# Altium PCB iMX6 Rex Development Baseboard V1I1_PCB.PcbDoc (part 2 of 6)
Units mm, origin at the board's own origin, x right, y up, seen from the top; angles counter-clockwise.
Board outline 135 x 110 mm, 6 copper layers (L1, L2, L3, L4 (PWR), L5, L6), stack 1.542 mm thick; 580 components, 458 nets, 2100 pads, 1201 vias.
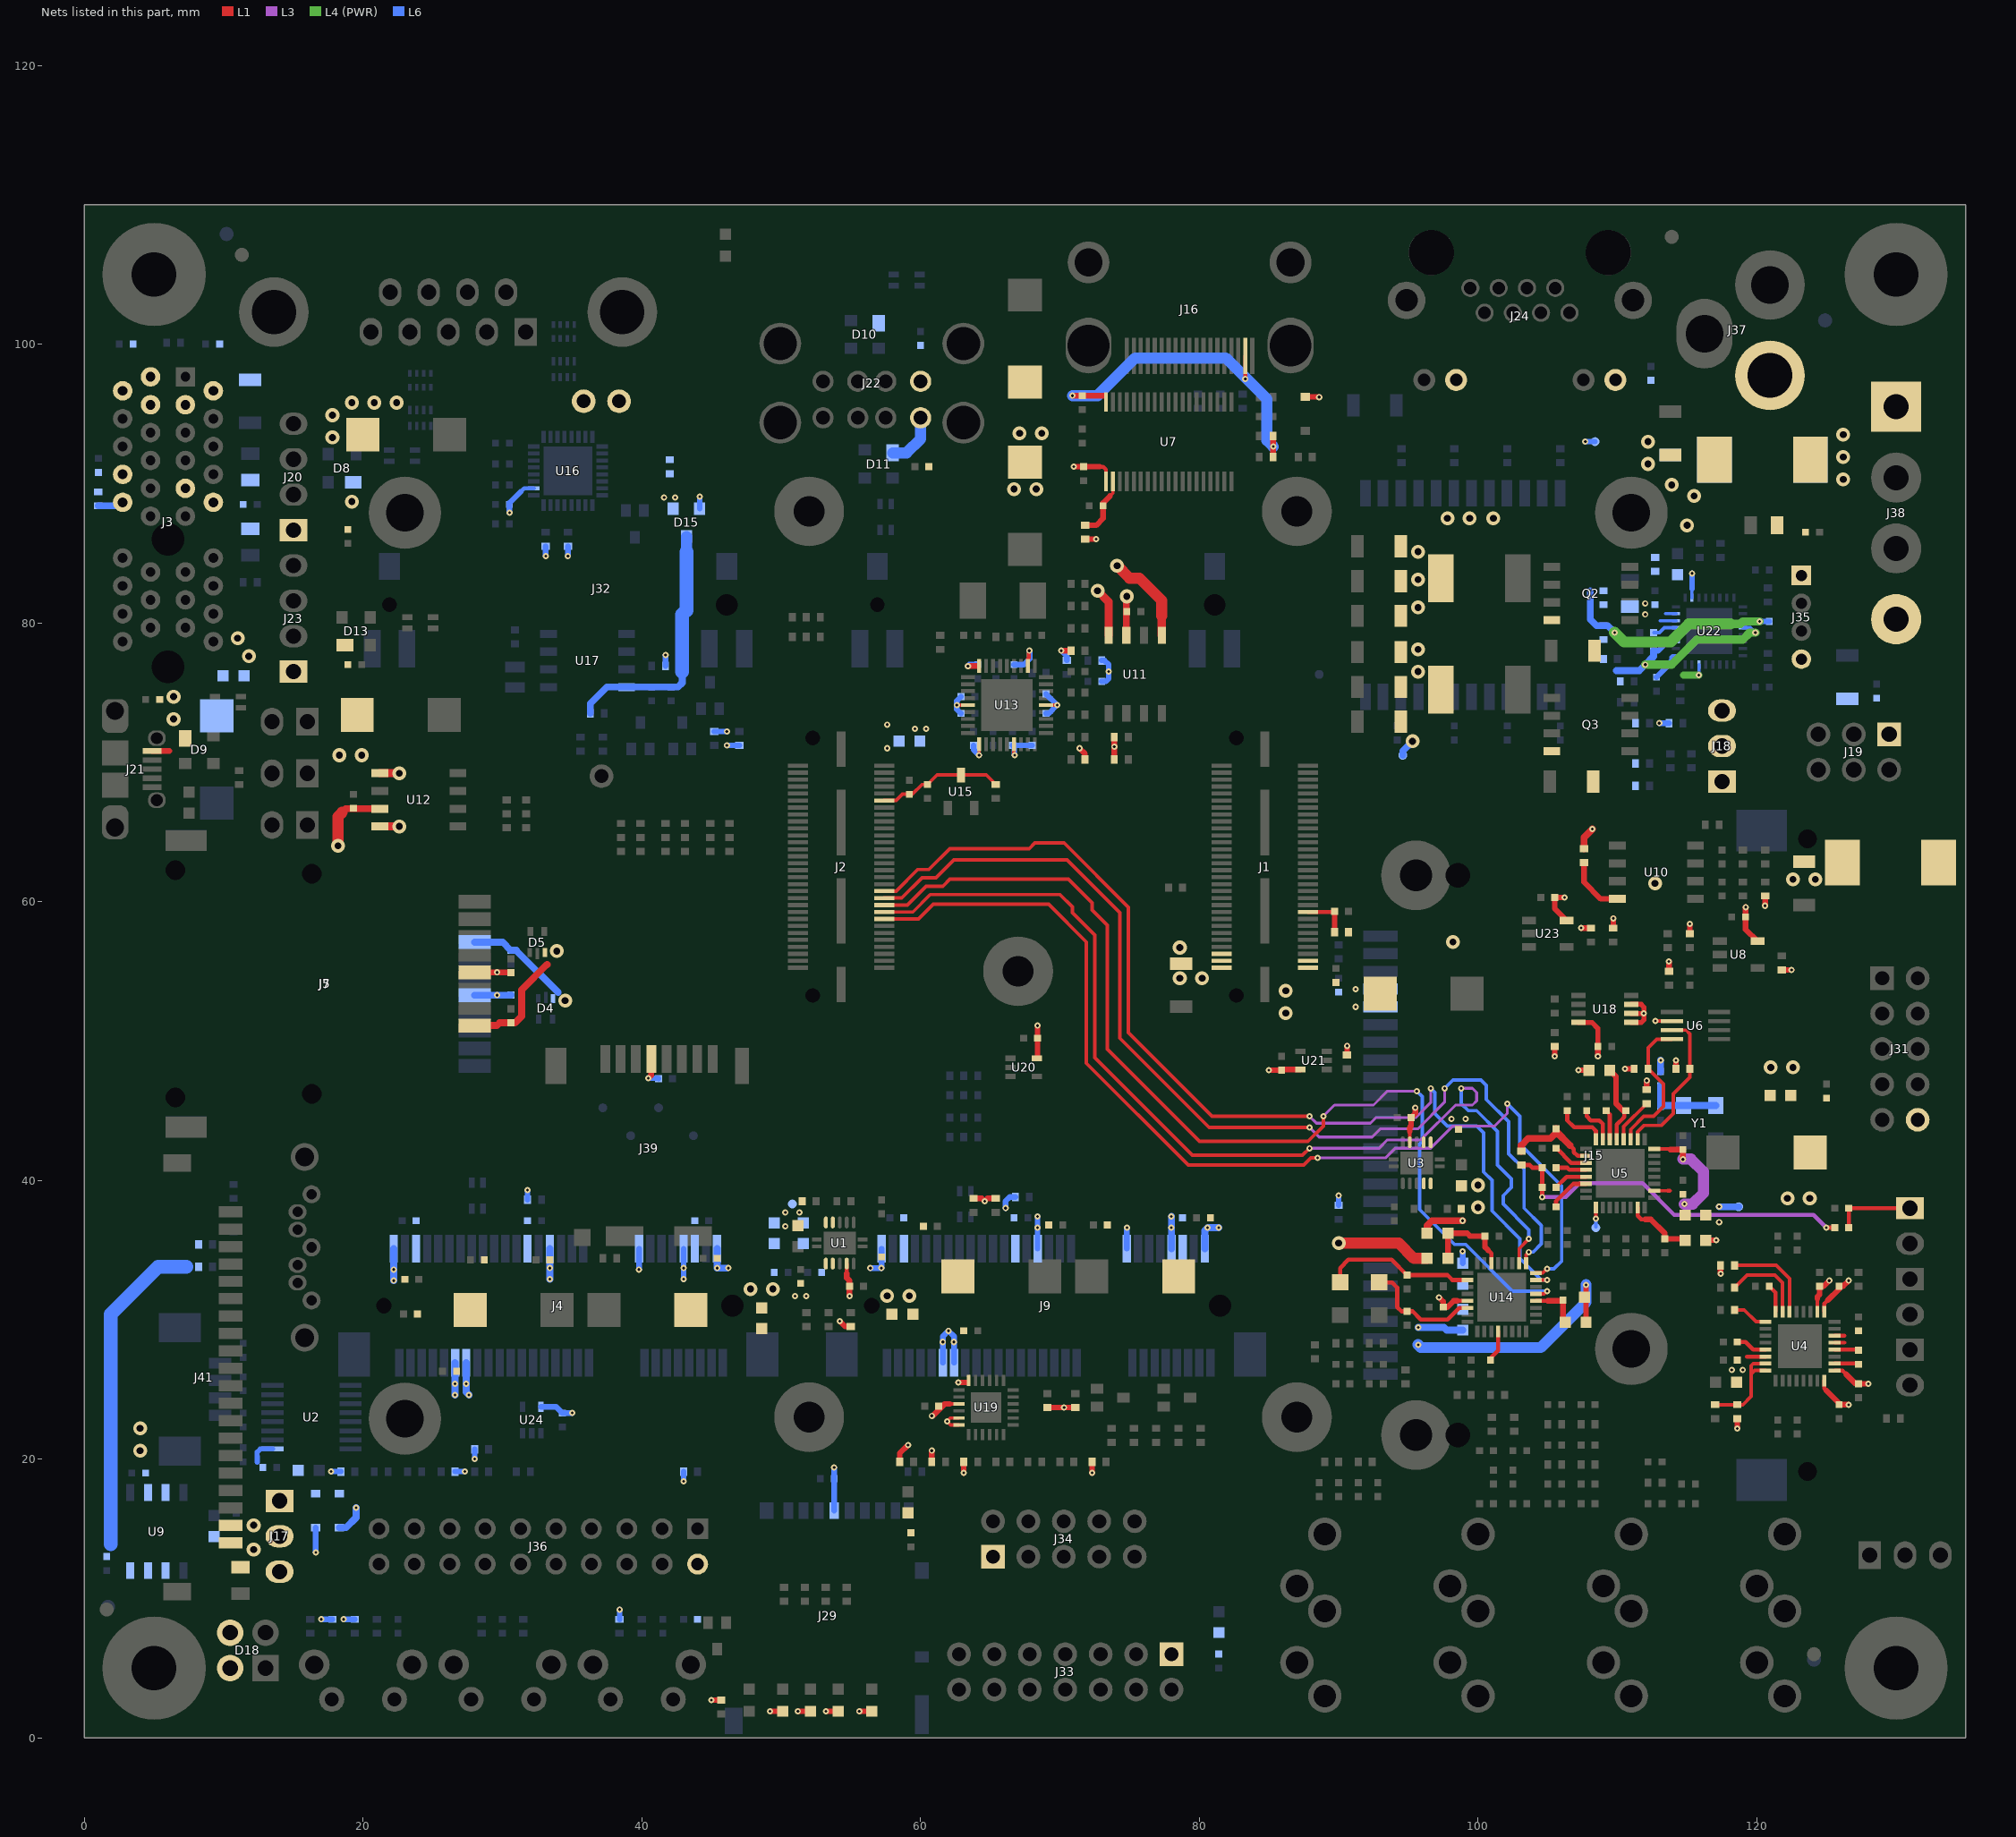
[diagram p6: the nets of this part, all layers, seen from the top]

## Footprints (in the part's own frame and the unit in brackets; to place one, negate y for a bottom-side part, rotate by r counter-clockwise, add the part's x,y. Pads: shape width x height; smd on the part's side, far side on the other; paste and mask are expansions set on the pad) (continued)
FSMRA2JH [mm] "Creator MM"
  round 1.8 hole 1: 1(-2.25,-1.245) 2(2.25,-1.245)
  round 2.2 hole 1.3: 3(-3.505,1.245) 4(3.505,1.245)
  silkscreen extent -3.65,-5.14 3.65,2.85, body extent -4.2,-5.09 4.2,2.77, height 7.05
FSMRA3JH [mm] "Creator MM"
  round 1.8 hole 1: 1(-2.25,-1.245) 2(2.25,-1.245)
  round 2.2 hole 1.3: 3(-3.505,1.245) 4(3.505,1.245)
  silkscreen extent -3.65,-7.14 3.65,2.85, body extent -4.2,-7.1 4.2,2.74, height 7.05
H5007NL [mil]
  rect 75x30 smd: 1(-287.5,275) 2(-287.5,225) 3(-287.5,175) 4(-287.5,125) 5(-287.5,75) 6(-287.5,25) 7(-287.5,-25) 8(-287.5,-75) 9(-287.5,-125) 10(-287.5,-175) 11(-287.5,-225) 12(-287.5,-275) 13(287.5,-275) 14(287.5,-225) 15(287.5,-175) 16(287.5,-125) 17(287.5,-75) 18(287.5,-25) 19(287.5,25) 20(287.5,75) 21(287.5,125) 22(287.5,175) 23(287.5,225) 24(287.5,275)
  silkscreen extent -240,-346 240,346, body extent -240,-346 240,346, height 217
HDMI [mm]
  rect 2.6x0.3 smd mask+0.025: 1(-3.36,4.5) 2(-3.36,4) 3(-3.36,3.5) 4(-3.36,3) 5(-3.36,2.5) 6(-3.36,2) 7(-3.36,1.5) 8(-3.36,1) 9(-3.36,0.5) 10(-3.36,0) 11(-3.36,-0.5) 12(-3.36,-1) 13(-3.36,-1.5) 14(-3.36,-2) 15(-3.36,-2.5) 16(-3.36,-3) 17(-3.36,-3.5) 18(-3.36,-4) 19(-3.36,-4.5)
  oval 4x3.3 hole 3: MTG1(-2.6,7.25) MTG3(-2.6,-7.25)
  round 3 hole 2: MTG2(3.36,7.25) MTG4(3.36,-7.25)
  silkscreen extent -5.1,-10 12.05,10, body extent -4.2,-7.5 7.95,7.5, height 6.28
HDR_1X2_2.54MM [mm]
  rect 2x1.6 hole 1.1: 1(0,0)
  oval 2x1.6 hole 1.1: 2(0,-2.54)
  silkscreen extent -1.3,-3.81 1.3,1.27, body extent -1.2,-3.62 1.2,1.06, height 8.4
HDR_1X2_2.54MM_SHDR [mm] "Creator MM"
  rect 2x1.6 hole 1.1: 1(0,0)
  oval 2x1.6 hole 1.1: 2(0,-2.54)
  silkscreen extent -2.3,-3.81 2.7,1.27, body extent -2.6,-3.31 2.65,0.77, height 9.34
HDR_1X3_2.54MM [mm] "Creator MM"
  rect 2x1.6 hole 1.1: 1(0,0)
  oval 2x1.6 hole 1.1: 2(0,-2.54) 3(0,-5.08)
  silkscreen extent -1.3,-6.36 1.3,1.27, body extent -1.2,-6.15 1.21,1.07, height 8.4
HDR_1X3_2.54MM_SHDR_V2 [mm] "Creator MM, Another 3D model."
  rect 2x1.6 hole 1.1: 1(0,0)
  oval 2x1.6 hole 1.1: 2(0,-2.54) 3(0,-5.08)
  silkscreen extent -2.3,-6.35 2.7,1.27, body extent -2.6,-5.85 2.65,0.77, height 9.34
HDR_1X4_2.54MM_SHDR [mm]
  rect 2x1.6 hole 1.1: 1(0,0)
  oval 2x1.6 hole 1.1: 2(0,-2.54) 3(0,-5.08) 4(0,-7.62)
  silkscreen extent -2.3,-8.9 2.7,1.3, body extent -2.6,-8.39 2.65,0.77, height 9.34
HDR_1X4_2MM_SHDR [mm] "Creator MM"
  rect 1.4x1.4 hole 0.8: 1(0,0)
  round 1.4 hole 0.8: 2(0,-2) 3(0,-4) 4(0,-6)
  silkscreen extent -2.25,-8.1 1.6,2.1, body extent -2.15,-8 1.5,2, height 5.55
HDR_2X3_2.54MM_BOXED [mm] "Creator MM"
  rect 1.7x1.7 hole 1.1: 1(0,0)
  round 1.7 hole 1.1: 2(2.54,0) 3(0,-2.54) 4(2.54,-2.54) 5(0,-5.08) 6(2.54,-5.08)
  silkscreen extent -3.03,-10.34 5.95,5.26, body extent -2.93,-10.15 5.88,5.06, height 8.89
HDR_2X5_2.54MM_BOXED [mm] "Creator MM"
  rect 1.7x1.7 hole 1: 1(0,0)
  round 1.7 hole 1: 2(2.54,0) 3(0,-2.54) 4(2.54,-2.54) 5(0,-5.08) 6(2.54,-5.08) 7(0,-7.62) 8(2.54,-7.62) 9(0,-10.16) 10(2.54,-10.16)
  silkscreen extent -2.9,-15.19 5.89,5.03, body extent -2.91,-15.22 5.91,5.08, height 8.89
HDR_2X7_2.54MM_BOXED [mm] "Creator MM"
  rect 1.7x1.7 hole 1: 1(0,0)
  round 1.7 hole 1: 2(2.54,0) 3(0,-2.54) 4(2.54,-2.54) 5(0,-5.08) 6(2.54,-5.08) 7(0,-7.62) 8(2.54,-7.62) 9(0,-10.16) 10(2.54,-10.16) 11(0,-12.7) 12(2.54,-12.7) 13(0,-15.24) 14(2.54,-15.24)
  silkscreen extent -2.9,-20.27 5.89,5.03, body extent -2.91,-20.31 5.9,5.06, height 8.89
HDR_2x10_2.54mm_BOXED [mm] "Creator MM"
  rect 1.5x1.5 hole 0.9: 1(0,0)
  round 1.5 hole 0.9: 2(0,-2.54) 3(-2.54,0) 4(-2.54,-2.54) 5(-5.08,0) 6(-5.08,-2.54) 7(-7.62,0) 8(-7.62,-2.54) 9(-10.16,0) 10(-10.16,-2.54) 11(-12.7,0) 12(-12.7,-2.54) 13(-15.24,0) 14(-15.24,-2.54) 15(-17.78,0) 16(-17.78,-2.54) 17(-20.32,0) 18(-20.32,-2.54) 19(-22.86,0) 20(-22.86,-2.54)
  silkscreen extent -28.04,-5.94 5.18,3.4, body extent -27.93,-5.85 5.09,3.3, height 9.9
HVQFN24_4X4MM [mm]
  rect 0.8x0.24 smd mask+0.025: 1(-1.95,1.25) 2(-1.95,0.75) 3(-1.95,0.25) 4(-1.95,-0.25) 5(-1.95,-0.75) 6(-1.95,-1.25) 13(1.95,-1.25) 14(1.95,-0.75) 15(1.95,-0.25) 16(1.95,0.25) 17(1.95,0.75) 18(1.95,1.25)
  rect 0.24x0.8 smd mask+0.025: 7(-1.25,-1.95) 8(-0.75,-1.95) 9(-0.25,-1.95) 10(0.25,-1.95) 11(0.75,-1.95) 12(1.25,-1.95) 19(1.25,1.95) 20(0.75,1.95) 21(0.25,1.95) 22(-0.25,1.95) 23(-0.75,1.95) 24(-1.25,1.95)
  rect 2.2x2.2 smd mask+0.025: 25(0,0)
  silkscreen extent -2,-2 2,2, body extent -2,-2 2,2, height 1
IHLP_255MILX270MIL [mil]
  rect 72x135 smd: 1(-109,0) 2(109,0)
  silkscreen extent -148,-148 148,148, body extent -135,-130 135,130, height 118
"IMX6 REX MODULE 3D" [mm] ".Creator MM"
  body extent 0,0 70,40, height 9.6
LED_0603 [mm]
  rect 0.8x0.8 smd: 1(-0.8,0) 2(0.8,0)
  silkscreen extent -1.78,-0.76 1.52,0.76, body extent -0.85,-0.4 0.85,0.4, height 0.66
MH_5.2MMD_2.7MMD [mm] "Creator MM"
  round 5.2 / inner round 3.683 / far side round 5.2 hole 2.7: 1(0,0)
MH_5MMD_2.2MMD [mm]
  round 5 / inner round 3.683 / far side round 5 hole 2.2: 1(0,0)
MH_7.4MMD_3.2MMD [mm]
  round 7.4 / inner round 3.683 / far side round 7.4 hole 3.2 mask+0.025: 1(0,0)
MINI_PCIE_36PIN [mm] "Creator MM. Bad shape of 3d model."
  rrect70% 0x0 hole 2.35: 1(0,0) 2(9.15,0)
  rect 1.4x1.4 hole 0.7: A1(-11.65,1.25)
  round 1.4 hole 0.7: A2(-10.65,3.25) A3(-9.65,1.25) A4(-8.65,3.25) A5(-7.65,1.25) A6(-6.65,3.25) A7(-5.65,1.25) A8(-4.65,3.25) A9(-3.65,1.25) A10(-2.65,3.25) A11(-1.65,1.25) A12(1.35,3.25) A13(2.35,1.25) A14(3.35,3.25) A15(4.35,1.25) A16(5.35,3.25) A17(6.35,1.25) A18(7.35,3.25) B1(-11.65,-1.25) B2(-10.65,-3.25) B3(-9.65,-1.25) B4(-8.65,-3.25) B5(-7.65,-1.25) B6(-6.65,-3.25) B7(-5.65,-1.25) B8(-4.65,-3.25) B9(-3.65,-1.25) B10(-2.65,-3.25) B11(-1.65,-1.25) B12(1.35,-3.25) B13(2.35,-1.25) B14(3.35,-3.25) B15(4.35,-1.25) B16(5.35,-3.25) B17(6.35,-1.25) B18(7.35,-3.25)
  silkscreen extent -14.75,-5.18 10.45,3.82, body extent -14.65,-5.1 10.35,3.6, height 10
MINI_PCIE_52PIN_CARD_CON [mm] "Creator MM"
  rect 2x0.6 smd mask+0.05: 1(-4.1,-0.7) 2(4.1,-1.1) 3(-4.1,-1.5) 4(4.1,-1.9) 5(-4.1,-2.3) 6(4.1,-2.7) 7(-4.1,-3.1) 8(4.1,-3.5) 9(-4.1,-3.9) 10(4.1,-4.3) 11(-4.1,-4.7) 12(4.1,-5.1) 13(-4.1,-5.5) 14(4.1,-5.9) 15(-4.1,-6.3) 16(4.1,-6.7) 17(-4.1,-10.3) 18(4.1,-10.7) 19(-4.1,-11.1) 20(4.1,-11.5) 21(-4.1,-11.9) 22(4.1,-12.3) 23(-4.1,-12.7) 24(4.1,-13.1) 25(-4.1,-13.5) 26(4.1,-13.9) 27(-4.1,-14.3) 28(4.1,-14.7) 29(-4.1,-15.1) 30(4.1,-15.5) 31(-4.1,-15.9) 32(4.1,-16.3) 33(-4.1,-16.7) 34(4.1,-17.1) 35(-4.1,-17.5) 36(4.1,-17.9) 37(-4.1,-18.3) 38(4.1,-18.7) 39(-4.1,-19.1) 40(4.1,-19.5) 41(-4.1,-19.9) 42(4.1,-20.3) 43(-4.1,-20.7) 44(4.1,-21.1) 45(-4.1,-21.5) 46(4.1,-21.9) 47(-4.1,-22.3) 48(4.1,-22.7) 49(-4.1,-23.1) 50(4.1,-23.5) 51(-4.1,-23.9) 52(4.1,-24.3)
  rect 3.2x2.3 smd: 53(-3.5,2.15) 54(-3.5,-27.15)
  rrect70% 0x0 hole 1.6: 55(0,0)
  rrect70% 0x0 hole 1.1: 56(0,-25)
  silkscreen extent -5.1,-26.8 5.1,1.8, body extent -5,-27.35 5,2.35, height 5.95
MINI_PCIE_52PIN_CARD_LATCH [mm] "Creator MM"
  rect 2.7x1.2 smd: 1(-3.15,1.25) 2(-3.15,-1.25) 4(-3.15,-22.95) 5(-3.15,-25.45)
  rect 1.9x1.5 smd: 3(2.75,0) 6(2.75,-24.2)
  rrect70% 0x0 hole 1.55: 7(0,0)
  rrect70% 0x0 hole 1.05: 8(0,-24.2)
  silkscreen extent -3.35,-26.6 3.95,2.4, body extent -3.95,-26.6 3.95,2.4, height 6.7
"MINI_PCIE_FULL CARD" [mm] ".Creator MM"
  body extent 0,0 50.95,30, height 6.9
"MSOP8 _SMALLER" [mm]
  rect 1.04x0.38 smd mask+0.076: 1(-1.9,0.975) 2(-1.9,0.325) 3(-1.9,-0.325) 4(-1.9,-0.975) 5(1.9,-0.975) 6(1.9,-0.325) 7(1.9,0.325) 8(1.9,0.975)
  silkscreen extent -1.5,-1.6 1.5,1.6, body extent -1.5,-1.6 1.5,1.6, height 0.9
POWER_JACK_5.5_2.1MM_NS [mm]
  round 5 hole 3.2: 1(2.35,-3.25)
  round 5 hole 2.7: 2(2.35,3.25)
  oval 4x5 hole 2.7: 3(-2.35,-0.25)
  silkscreen extent -2.4,-3.9 6.85,16.6, body extent -2.55,-3.9 6.85,10.5, height 11
"PW (R-PDGO-G16)" [mm] "Creator MM"
  rect 1.6x0.35 smd mask+0.07: 1(-2.8,2.275) 2(-2.8,1.625) 3(-2.8,0.975) 4(-2.8,0.325) 5(-2.8,-0.325) 6(-2.8,-0.975) 7(-2.8,-1.625) 8(-2.8,-2.275) 9(2.8,-2.275) 10(2.8,-1.625) 11(2.8,-0.975) 12(2.8,-0.325) 13(2.8,0.325) 14(2.8,0.975) 15(2.8,1.625) 16(2.8,2.275)
  silkscreen extent -1.7,-2.6 1.7,2.6, body extent -3.2,-2.5 3.22,2.5, height 0.99
"QFN32 5X5X0.85" [mm]
  rect 0.85x0.3 smd mask+0.025: 1(-2.45,1.75) 2(-2.45,1.25) 3(-2.45,0.75) 4(-2.45,0.25) 5(-2.45,-0.25) 6(-2.45,-0.75) 7(-2.45,-1.25) 8(-2.45,-1.75) 17(2.45,-1.75) 18(2.45,-1.25) 19(2.45,-0.75) 20(2.45,-0.25) 21(2.45,0.25) 22(2.45,0.75) 23(2.45,1.25) 24(2.45,1.75)
  rect 0.3x0.85 smd mask+0.025: 9(-1.75,-2.45) 10(-1.25,-2.45) 11(-0.75,-2.45) 12(-0.25,-2.45) 13(0.25,-2.45) 14(0.75,-2.45) 15(1.25,-2.45) 16(1.75,-2.45) 25(1.75,2.45) 26(1.25,2.45) 27(0.75,2.45) 28(0.25,2.45) 29(-0.25,2.45) 30(-0.75,2.45) 31(-1.25,2.45) 32(-1.75,2.45)
  rect 3.5x3.5 smd paste-10 mask+0.025: 33(0,0)
  silkscreen extent -2.5,-2.5 2.5,2.5, body extent -2.5,-2.5 2.5,2.5, height 0.9
QFN36_6MMX6MM [mm] "Creator MM"
  rect 1x0.28 smd mask+0.025: 1(-2.8,2) 2(-2.8,1.5) 3(-2.8,1) 4(-2.8,0.5) 5(-2.8,0) 6(-2.8,-0.5) 7(-2.8,-1) 8(-2.8,-1.5) 9(-2.8,-2) 19(2.8,-2) 20(2.8,-1.5) 21(2.8,-1) 22(2.8,-0.5) 23(2.8,0) 24(2.8,0.5) 25(2.8,1) 26(2.8,1.5) 27(2.8,2)
  rect 0.28x1 smd mask+0.025: 10(-2,-2.8) 11(-1.5,-2.8) 12(-1,-2.8) 13(-0.5,-2.8) 14(0,-2.8) 15(0.5,-2.8) 16(1,-2.8) 17(1.5,-2.8) 18(2,-2.8) 28(2,2.8) 29(1.5,2.8) 30(1,2.8) 31(0.5,2.8) 32(0,2.8) 33(-0.5,2.8) 34(-1,2.8) 35(-1.5,2.8) 36(-2,2.8)
  rect 3.7x3.7 smd paste-10 mask+0.025: 37(0,0)
  silkscreen extent -3.1,-3.1 3.1,3.1, body extent -3.1,-3.1 3.1,3.1, height 0.9
QTH-030-01-L-D-A [mm]
  rect 1.45x0.3 smd mask+0.025: 1(3.09,7.25) 2(-3.09,7.25) 3(3.09,6.75) 4(-3.09,6.75) 5(3.09,6.25) 6(-3.09,6.25) 7(3.09,5.75) 8(-3.09,5.75) 9(3.09,5.25) 10(-3.09,5.25) 11(3.09,4.75) 12(-3.09,4.75) 13(3.09,4.25) 14(-3.09,4.25) 15(3.09,3.75) 16(-3.09,3.75) 17(3.09,3.25) 18(-3.09,3.25) 19(3.09,2.75) 20(-3.09,2.75) 21(3.09,2.25) 22(-3.09,2.25) 23(3.09,1.75) 24(-3.09,1.75) 25(3.09,1.25) 26(-3.09,1.25) 27(3.09,0.75) 28(-3.09,0.75) 29(3.09,0.25) 30(-3.09,0.25) 31(3.09,-0.25) 32(-3.09,-0.25) 33(3.09,-0.75) 34(-3.09,-0.75) 35(3.09,-1.25) 36(-3.09,-1.25) 37(3.09,-1.75) 38(-3.09,-1.75) 39(3.09,-2.25) 40(-3.09,-2.25) 41(3.09,-2.75) 42(-3.09,-2.75) 43(3.09,-3.25) 44(-3.09,-3.25) 45(3.09,-3.75) 46(-3.09,-3.75) 47(3.09,-4.25) 48(-3.09,-4.25) 49(3.09,-4.75) 50(-3.09,-4.75) 51(3.09,-5.25) 52(-3.09,-5.25) 53(3.09,-5.75) 54(-3.09,-5.75) 55(3.09,-6.25) 56(-3.09,-6.25) 57(3.09,-6.75) 58(-3.09,-6.75) 59(3.09,-7.25) 60(-3.09,-7.25)
  rect 0.64x2.54 smd mask+0.025: 61(0,8.445) 64(0,-8.445)
  rect 0.64x4.7 smd mask+0.025: 62(0,3.175) 63(0,-3.175)
  round 0 hole 1.05 unplated: 65(2.03,-9.24) 66(2.03,9.24)
  silkscreen extent -3,-10 3.5,10, body extent -3.55,-10 3.56,10, height 4.26
R0402 [mm]
  rect 0.5x0.6 smd: 1(-0.5,0) 2(0.5,0)
  silkscreen extent -1,-0.6 1,0.6, body extent -0.5,-0.25 0.5,0.25, height 0.4
RJ45LED [mm]
  round 1.3 hole 0.9: 1(2.03,3.55) 2(0.25,2.53) 3(2.03,1.52) 4(0.25,0.5) 5(2.03,-0.51) 6(0.25,-1.52) 7(2.03,-2.54) 8(0.25,-3.56)
  round 1.575 hole 0.9: 9(-4.57,6.86) 10(-4.57,4.57) 11(-4.57,-4.57) 12(-4.57,-6.86)
  round 2.7 hole 1.6: 13(1.14,8.13) 14(1.14,-8.13)
  round 3.25 hole 3.25 unplated: 15(4.57,6.35) 16(4.57,-6.35)
  silkscreen extent -5.91,-8.3 16.6,8.3, body extent -5.9,-9.3 10.82,9.33, height 14.8
SATA_VERTICAL [mm]
  round 1.3 hole 0.74: 1(0,0) 4(-3.81,0) 7(-7.62,0)
  oval 1.1x1.3 hole 0.74: 2(-1.27,1) 3(-2.54,1) 5(-5.08,1) 6(-6.35,1)
  round 2 hole 1.35: 8(2.67,0.5) 9(-10.29,0.5)
  silkscreen extent -12.51,-2.6 4.49,3.9, body extent -12.43,-2.55 4.47,3.9, height 8.43
SC70_5 [mm]
  rect 0.75x0.4 smd mask+0.025: 1(-0.95,0.65) 2(-0.95,0) 3(-0.95,-0.65) 4(0.95,-0.65) 5(0.95,0.65)
  silkscreen extent -0.76,-1.14 0.76,1.14, body extent -1.21,-1.14 1.21,1.14, height 1.1
SC70_SOT323 [mm]
  rect 0.9x0.7 smd: 1(-0.95,0.65) 2(-0.95,-0.65) 3(0.95,0)
  silkscreen extent -0.7,-1.27 0.7,1.27, body extent -1.27,-1.27 1.27,1.27, height 1.1
SIM_CARD_PUSH [mm] "Creator MM"
  rect 2.95x1.5 smd: 1(20.7,-4.37) 2(20.7,16.18)
  rrect70% 0x0 hole 1.4: 3(21.47,-2.26) 4(11.67,13.79)
  rect 2.3x1 smd mask+0.051: C1(0,8.89) C2(0,6.35) C3(0,3.81) C5(0,7.62) C6(0,5.08) C7(0,2.54) S1(0,1.27) S2(0,0)
  silkscreen extent -0.65,-3.87 27.75,15.68, body extent -0.55,-4.6 25.95,16.35, height 1.8
SJ1-3535NG [mm]
  round 2.4 hole 1.6: 1(0,0) 2(-2,2.4) 3(-2,7.9) 4(0,11.6) 5(0,6.1)
  silkscreen extent -4.2,-5.2 4,12.8, body extent -4.2,-5.25 4,12.8, height 12.3
SMC [mm]
  rect 2.5x3.3 smd: 1(-3.45,0) 2(3.45,0)
  silkscreen extent -4.6,-3.2 4.65,3.2, body extent -3.98,-2.95 3.97,2.95, height 2.3
SOD323 [mil]
  rect 22x27 smd mask+3: 1(-48,0) 2(48,0)
  silkscreen extent -75,-28 71,28, body extent -49,-25 49,25, height 39
SOT143 [mm]
  rect 0.9x1.2 smd: 1(-1,0.8)
  rect 0.9x0.8 smd: 2(-1,-1) 3(1,-1) 4(1,1)
  silkscreen extent -1,-1.7 1,1.7, body extent -1,-1.7 1,1.7, height 1
SOT665 [mm] "Creator MM"
  rect 0.65x0.325 smd mask+0.05: 1(-0.75,0.538) 3(-0.75,-0.538)
  rect 0.8x0.25 smd mask+0.05: 2(-0.825,0)
  rect 0.65x0.4 smd mask+0.05: 4(0.75,-0.5) 5(0.75,0.5)
  silkscreen extent -1.2,-0.92 0.8,1.2, body extent -0.8,-0.8 0.8,0.8, height 0.6
SOT-23-3-123 [mm]
  rect 0.9x0.8 smd: 1(-1,0.95) 2(-1,-0.95) 3(1,0)
  silkscreen extent -0.76,-1.65 0.76,1.65, body extent -1.27,-1.65 1.27,1.65, height 1.1
TP_25C#1 [mm]
  round 0.635 smd paste-0.635 mask+0.051: 1(0,0)
TP_25C#2 [mm]
  round 0.635 smd paste-0.635 mask+0.051: 1(0,-0.05)
TSSOP_38 [mm]
  rect 1.4x0.28 smd mask+0.025: 1(-2.85,4.5) 2(-2.85,4) 3(-2.85,3.5) 4(-2.85,3) 5(-2.85,2.5) 6(-2.85,2) 7(-2.85,1.5) 8(-2.85,1) 9(-2.85,0.5) 10(-2.85,0) 11(-2.85,-0.5) 12(-2.85,-1) 13(-2.85,-1.5) 14(-2.85,-2) 15(-2.85,-2.5) 16(-2.85,-3) 17(-2.85,-3.5) 18(-2.85,-4) 19(-2.85,-4.5) 20(2.85,-4.5) 21(2.85,-4) 22(2.85,-3.5) 23(2.85,-3) 24(2.85,-2.5) 25(2.85,-2) 26(2.85,-1.5) 27(2.85,-1) 28(2.85,-0.5) 29(2.85,0) 30(2.85,0.5) 31(2.85,1) 32(2.85,1.5) 33(2.85,2) 34(2.85,2.5) 35(2.85,3) 36(2.85,3.5) 37(2.85,4) 38(2.85,4.5)
  silkscreen extent -3.1,-5 2.3,5.1, body extent -2.3,-5 2.3,5, height 1.2
USB-2A [mm]
  round 1.524 hole 1: 1(3.5,0.13) 2(1,0.13) 3(-1,0.13) 4(-3.5,0.13) 5(3.5,-2.49) 6(1,-2.49) 7(-1,-2.49) 8(-3.5,-2.49)
  round 3 hole 2.4: 9(-6.57,2.84) 10(6.57,2.84) 11(-6.57,-2.84) 12(6.57,-2.84)
  silkscreen extent -10.75,-4.5 10.75,18.4, body extent -8.1,-4.1 8.14,13.08, height 15.78
USB_MICRO_AB [mm] "Creator MM"
  rect 1.35x0.4 smd mask+0.025: 1(2.675,1.3) 2(2.675,0.65) 3(2.675,0) 4(2.675,-0.65) 5(2.675,-1.3)
  rrect84% 1.25x1.1 hole 0.85 mask+0.04: 6(3,2.225) 7(3,-2.225)
  rrect60% 1.9x2.425 hole 1.3 copper offset 0,-0.363: 8(0,4.175)
  rect 1.9x1.8 smd paste-10: 9(0,1.15) 10(0,-1.15)
  rrect60% 1.9x2.425 hole 1.3 copper offset 0,0.363: 11(0,-4.175)
  silkscreen extent -2.75,-4.3 2.85,4.3, body extent -2.75,-4.32 3.04,4.33, height 2.76
USD_DM3AT [mm] "MM added 3D model & assembly layer."
  rect 1.2x0.7 smd: 1(0,0) 2(0,-1.1) 3(0,-2.2) 4(0,-3.3) 5(0,-4.4) 6(0,-5.5) 7(0,-6.6)
  rect 1.2x0.7 smd mask+0.07: 8(0,-7.7) 9(0,-8.65)
  rect 1.2x1 smd: 10(4.3,-9.6) 14(0,1.55)
  rect 0.8x1 smd: 11(10.5,-9.6)
  rect 2.8x1 smd: 12(14.65,-9.6)
  rect 1.9x1.3 smd: 13(15.1,3.9)
  silkscreen extent -0.23,-10.03 17.49,4.44, body extent -0.1,-9.7 16.05,4.15, height 1.68
USD_DM3CS [mm] "Creator MM"
  rect 2x0.7 smd: 1(-6.4,-3.125) 2(-6.4,-2.025) 3(-6.4,-0.925) 4(-6.4,0.175) 5(-6.4,1.275) 6(-6.4,2.375) 7(-6.4,3.475) 8(-6.4,4.575)
  rect 1.4x2.7 smd: 9(6.3,-1.725) 13(6.3,3.175)
  rect 2.6x1.5 smd: 10(-5.9,-6.675)
  rect 2.6x1 smd: 11(-5.9,6.675)
  rect 1.2x1.2 smd: 12(6.4,-4.775)
  silkscreen extent -9.95,-7.22 7,6.97, body extent -7.1,-7.02 7,6.78, height 1.98
"VQFN32 5X5X0.85" [mm] "Creator MM"
  rect 0.85x0.28 smd mask+0.025: 1(-2.475,1.75) 2(-2.475,1.25) 3(-2.475,0.75) 4(-2.475,0.25) 5(-2.475,-0.25) 6(-2.475,-0.75) 7(-2.475,-1.25) 8(-2.475,-1.75) 17(2.475,-1.75) 18(2.475,-1.25) 19(2.475,-0.75) 20(2.475,-0.25) 21(2.475,0.25) 22(2.475,0.75) 23(2.475,1.25) 24(2.475,1.75)
  rect 0.28x0.85 smd mask+0.025: 9(-1.75,-2.475) 10(-1.25,-2.475) 11(-0.75,-2.475) 12(-0.25,-2.475) 13(0.25,-2.475) 14(0.75,-2.475) 15(1.25,-2.475) 16(1.75,-2.475) 25(1.75,2.475) 26(1.25,2.475) 27(0.75,2.475) 28(0.25,2.475) 29(-0.25,2.475) 30(-0.75,2.475) 31(-1.25,2.475) 32(-1.75,2.475)
  rect 3.15x3.15 smd paste-10 mask+0.025: 33(0,0)
  silkscreen extent -2.5,-2.5 2.5,2.5, body extent -2.5,-2.5 2.5,2.5, height 0.9

## Part data
C1 C3 C6 C8 C9 C10 C14 C17 C22 C23 C27 C28 C29 C30 C31 C57 C69 C71 C72 C73 C74 C75 C77 C78 C80 C83 C84 C86 C88 C89 C90 C93 C94 C97 C98 C101 C103 C106 C108 C109 C110 C111 C112 C114 C115 C116 C117 C118 C120 C121 C127 C128 C129 C140 C148 C151 C152 C153 C154 C155 C156 C157 C158 C163 C166 C167 C170 C171 C173 C175 C176 C178 C180 C186 C187 C195 C198 C199 C200 C201 C202 C203 C204 C205 C206 C207 C213 C214 C216 C218: library part C1005X5R1H104K, "CAP CER .10UF 50V X5R 10% 0402"
C2 C7 C82 C184 C185 C196 C197 C208: library part GRM31CR6YA106KA12L, "CAP CER 10UF 35V X5R 1206"
C4 C18 C33 C37 C38 C39 C41 C42 C44 C45 C46 C48 C50 C51 C53 C58 C59 C60 C61 C63 C64 C65 C66 C68 C81 C95 C105 C107 C113 C130 C131 C136 C138 C147 C159 C161 C162 C168 C169 C181 C182 C209 C211: library part C1005X5R1C105K, "CAP CER 1.0UF 16V X5R 0402"
C5 C11 C79 C177: library part C2012X5R1C226K, "CAP CER 22UF 16V 10% X5R 0805"
C12 C13 C24 C25 C70: library part T520D337M006ATE045, "CAP TANT 330UF 6.3V 20% 2917"
C15 C16 C19 C26 C32 C34 C102 C104 C141 C142 C210 C212 C215 C217: library part C1005X5R1A475M, "CAP CER 4.7UF 10V 20% X5R 0402"
C20 C35 C43 C76 C126 C150 C172 C174 C179: library part C1608X5R0J106M, "CAP CER 10UF 6.3V X5R 20% 0603"
C21 C36 C132 C133 C143 C144: library part GRM155R71H272KA01D, "CAP CER 2700PF 50V 10% X7R 0402"
C40 C85 C87 C91 C92 C96: library part T495D337K010ATE150, "CAP TANT 330UF 10V 10% 2917"
C47 C52 C55 C56 C67: library part C1005X5R1C474K, "CAP CER .47UF 16V X5R 0402"
C49: library part C1005X7R1H103K, "CAP CER 10000PF 50V 10% X7R 0402"
C54 C122 C123 C134 C135 C145 C146 C149: library part GRM155R71H271KA01D, "CAP CER 270PF 50V 10% X7R 0402"
C62: library part C1005X5R1A225K, "CAP CER 2.2UF 10V 10% X5R 0402"
C99 C100: library part C1005C0G1H180J, "CAP CER 18PF 50V C0G 5% 0402"
C119: library part C1206X102KGRACTU, "CAP CER 1000PF 2000V X7R 1206 FT"
C124 C125: library part C1005C0G1H101J, "CAP CER 100PF 50V 5% NP0 0402"
C137 C139: library part TLNS227M004R3000, "CAP TANT 220UF 4V 20% 1206"
C160: library part C1005X5R1E224M, "CAP CER .22UF 25V X5R 20% 0402"
C164 C165: library part CKCL44X7R1H221M, "CAP ARRAY 4CH 220PF 50V 0805"
C183: library part GRM21BR71H105KA12L, "CAP CER 1UF 50V X7R 0805"
C188 C189 C190 C191 C192 C193: library part C3216X5R1A107M, "CAP CER 100UF 10V X5R 20% 1206"
C194: library part C1005X7R1C103K, "CAP CER 10000PF 16V X7R 10% 0402"
CFAST1: "CF CARD EJECT/LATCHING RETAINER"
CR1 CR2: library part Card_Mini_PCIe, "Card MIni PCIe"
D1 D2 D3 D6: library part "LG L29K-G2J1-24-Z", "LED SMARTLED GREEN 570NM 0603"
D4 D5: "TVS ZENER QUAD 5.6V SOT665"
D7 D21 D22: "DIODE SCHOTTKY 30V 0.2A SOD323"
D8 D9 D10 D11 D13: "DIODE SWITCHING 50V SOT-143"
D12 D14: library part "LS L29K-H1J2-1-Z", "LED SMARTLED RED 630NM 0603 SMD"
D15: "DIODE SCHOTTKY DUAL 30V SOT23-3"
D16 D17 D20: "DIODE SCHOTTKY 60V 5A SMC"
D18: "LED 2HI 3MM GREEN OVER RED PCMNT"
D19: "SUPPRESSOR ESD 24VDC 0603 SMD"
FB1 FB2 FB3 FB4 FB22: library part BLM18SG221TN1D, "FERRITE CHIP 220 OHM 2500MA 0603"
FB5 FB8 FB9 FB14 FB15 FB16 FB17 FB18 FB24: "FERRITE CHIP 600 OHM 0402 420mA"
FB6 FB7 FB10 FB11 FB12 FB13 FB19 FB23 FB25 FB26: library part MPZ1608S601A, "FERRITE CHIP BEAD 600 OHM SMD 1A"
FB20 FB21: library part BLA2ABB221SN4D, "FERRITE ARRAY 220 OHM 0804 SMD"
FID1 FID2 FID3 FID4 FID5 FID6 FID7 FID8: "Fiducial 40mil Diameter, 120mil Mask"
J1 J2: "CONN HEADER HS .5MM 60POS DL AU"
J3: "CONN PCI EXPRESS 36POS VERT PCB"
J4 J9: "CONN MINI EXPRESS CARD 52POS SMD"
J5 J7: "CONN CARD HOLDER SIM 6POS SMD"
J6 J8: "CONN MINI EXPRESS CARD LATCH SMD"
J10 J11 J12: "CONN HEADER 2POS .100\" STR GOLD"
J13: "CONN HEADER 3POS .100\" STR GOLD"
J14: "CONN SATA HDR 7POS PCB VERT"
J15: "CFAST HEADER STANDOFF SMD R/A"
J16: "CONN RCPT 19POS HDMI RT ANG SMD"
J17 J18: library part 68000-103HLF, "BERGSTIK II .100\" SR STRAIGHT"
J19: library part 30306-6002HB, "CONN HEADER 6POS DL STR GOLD"
J20 J23: "CONN HEADER 4POS .100\" STR GOLD"
J21: library part 0475890001, "CONN RCPT MICRO USB AB R/A SMD"
J22: "CONN RCPT R/A 4OVER4POS GOLD PCB"
J24: "CONN MOD JACK 8POS R/A G-Y PCB"
J25: "CONN JACK STEREO R/A 5PIN 3.5MM"
J26 J27 J28: "CONN JACK STEREO 5POS 3.5MM PCB"
J29: "CONN MICRO SD R/A PUSH-PUSH SMD"
J30: "CONN D-SUB PLUG R/A 9POS GOLD/FL"
J31 J34: library part D2510-6002-AR, "CONN HEADER 10POS VERT 10GOLD"
J32: "HOLDER COIN CELL CR2032 EJECT"
J33: library part D2514-6002-AR, "CONN HEADER 14POS VERT 10GOLD"
J35: library part 0532530470, "CONN HEADER 4POS 2MM VERT TIN"
J36: "CONN HEADER LOPRO STR 20POS GOLD"
J37: "CONN PWR JACK 2.1X5.5MM HIGH CUR"
J38: "CONN HEADER 4POS .200 VERT"
J39: "CONN MICRO SD R/A HING TYPE SMD"
J40: "CONN HEADER 4POS 1.25MM R/A SMD"
J41: "CONN RCPT 1.25MM 20POS SMD R/A"
JP1 JP2 JP3: library part 68001-202HLF, "BERGSTIK II .100\" SR STRAIGHT"
L1 L2 L3 L4 L5 L6 L7: "CHOKE COMM MODE 90 OHM .4A SMD"
L8 L9: library part IHLP2525CZER4R7M01, "INDUCTOR POWER 4.7UH 5.5A SMD"
M1: library part 3D_iMX6_REX_MODULE_V1I1, "Printed Circuit Board"
MH1 MH2 MH3 MH4 MH13: "Mounting Hole 5mm Diameter, 2.2mm Drill"
MH5 MH6 MH7 MH8: "Mounting Hole 7.4mm Diameter, 3.2mm Drill"
MH9 MH10 MH11 MH12: "Mounting Hole 5.2mm Diameter, 2.7mm Drill"
Q1 Q4 Q5 Q6 Q7 Q8 Q9: "MOSFET N-CH 60V 310MA SOT323"
Q2 Q3: "MOSFET DL N-CH 30V 6.8A 8-SOIC"
R1 R2 R3 R4 R5 R6 R7 R8 R9 R10 R11 R12 R13 R14 R16 R24 R32 R34 R36 R37 R38 R39 R40 R41 R42 R43 R46 R56 R62 R63 R64 R65 R66 R67 R68 R69 R88 R89 R104 R105 R106 R112 R113 R120 R123 R124 R128 R129 R130 R133 R137 R138 R143 R153 R155 R156 R159 R162 R163 R164 R169 R170 R173 R174 R184: library part RC0402JR-070RL, "RES 0.0 OHM 1/16W 0402 SMD"
R15 R31 R33 R35 R51 R52 R53 R54 R55 R70 R71 R72 R73 R108 R109 R111 R114 R115 R116 R117 R118 R121 R122 R134 R135 R136 R139 R140 R147 R150 R151 R152 R154 R157 R158 R165 R166 R167 R168 R172 R183 R187: library part RC0402FR-0710KL, "RES 10.0K OHM 1/16W 1% 0402 SMD"
R17 R131 R132 R175 R176 R177 R178 R179 R180 R181 R182: library part RC0402FR-07200KL, "RES 200K OHM 1/16W 1% 0402 SMD"
R18: library part CRCW04022K10FKED, "RES 2.10K OHM 1/16W 1% 0402 SMD"
R19 R21 R22 R25 R107: library part CRCW0402330RFKED, "RES 330 OHM 1/16W 1% 0402 SMD"
R20 R27: library part CRCW04022K40FKED, "RES 2.40K OHM 1/16W 1% 0402 SMD"
R23: library part RC0402FR-071ML, "RES 1.00M OHM 1/16W 1% 0402 SMD"
R26: library part RC0402FR-073KL, "RES 3K OHM 1/16W 1% 0402 SMD"
R28 R29 R30 R102: library part RC0402FR-072K2L, "RES 2.20K OHM 1/16W 1% 0402 SMD"
R44 R74 R75 R76 R77 R79 R80 R82 R83 R96 R97 R171 R185 R186: library part RMCF0402FT100K, "RES 100K OHM 1/16W 1% 0402 SMD"
R45 R59 R78 R110: library part RC0402FR-071KL, "RES 1.00K OHM 1/16W 1% 0402 SMD"
R47 R90 R91: library part RC0402FR-0715KL, "RES 15.0K OHM 1/16W 1% 0402 SMD"
R48 R49 R57 R160 R161: library part RMCF0402FT4K99, "RES TF 4.99K OHM 1% 1/16W 0402"
R50: library part RC0402FR-0727KL, "RES 27.0K OHM 1/16W 1% 0402 SMD"
R58: library part RMCF0402FT365R, "RES TF 365 OHM 1% 1/16W 0402"
R60: library part CRCW04021K80FKED, "RES 1.80K OHM 1/16W 1% 0402 SMD"
R61: library part RC0402FR-073K3L, "RES 3.30K OHM 1/16W 1% 0402 SMD"
R81: library part RC0402FR-0712KL, "RES 12.0K OHM 1/16W 1% 0402 SMD"
R84 R85 R86 R87: library part RC0402FR-0775RL, "RES 75.0 OHM 1/16W 1% 0402 SMD"
R92 R93 R141 R142 R149: library part RMCF0402FT33R0, "RES TF 33 OHM 1% 1/16W 0402"
R94 R95 R119: library part RC0402FR-07100RL, "RES 100 OHM 1/16W 1% 0402 SMD"
R98 R99: library part CRCW0402562RFKED, "RES 562 OHM 1/16W 1% 0402 SMD"
R100 R101: library part RC0402FR-0747K5L, "RES 47.5K OHM 1/16W 1% 0402 SMD"
R125: library part RC0402FR-0710RL, "RES 10.0 OHM 1/16W 1% 0402 SMD"
R126 R127: library part RC0402FR-071RL, "RES 1.00 OHM 1/16W 1% 0402 SM"
R144 R145 R146 R148: library part RMCF0402FT240R, "RES TF 240 OHM 1% 0.0625W 0402"
SW1 SW2 SW3: "SWITCH TACTILE SPST-NO 0.05A 12V"
T1: "MODULE SINGLE GIGABIT LAN 24SOIC"
TP1 TP2 TP3 TP4 TP5 TP6 TP7 TP8 TP9 TP10: "Test Point 25mil"
U1 U3: "IC REG LDO ADJ 1.5A 10SON"
U2: "IC TOUCH SCREEN 12BIT 16TSSOP"
U4: "IC AMP AUDIO PWR 2.6W AB 32VQFN"
U5: "IC STEREO AUD CODEC LP 32TQFN-EP"
U6: "IC VOLT-LEVEL TRANSLATOR SM8"
U7: "IC HDMI TX PORT P/I 38-TSSOP"
U8 U23: "IC GATE AND SGL 2INP SOT23-5"
U9: "IC 3.0A POWER DIST SWITCH 8-SOIC"
U10: "IC OPAMP DUAL 0-70DEG C 8-SOIC"
U11 U12: "IC SW DISTRIBUTION 2CHAN 8SOIC"
U13: "USB HUB CONT IND TEMP 36QFNE3"
U14: "IC AUDIO CODEC STEREO 32-QFN"
U15: "IC VOLT SUPERVISR 2.93V SOT23-3"
U16: "IC 3DRVR/5RCVR RS232 3V 32-QFN"
U17: "IC REAL TIME CLK/CALENDAR 8-SOIC"
U18: "IC EEPROM 2KBIT 400KHZ 8MSOP"
U19: library part PCA9535BS,118, "IC I/O EXPANDER I2C 16B 24HVQFN"
U20 U21 U24: "SINGLE POSITIVE AND GATE SC-70"
U22: "IC MAIN PWR CTRLR QUAD 32-QFN"
Y1: library part ASFLMB-12.288MHZ-LR-T, "OSC MEMS 12.288 MHZ SMD"
Y2: library part ABM7-24.000MHZ-D-2-Y-T, "CRYSTAL 24.0000MHZ 18PF SMD"
Y3: library part ABS06-32.768KHZ-9-1-T, "CRYSTAL 32.768 KHZ 9.0 PF SMD"

## Via types
v1: diameter 0.45, hole 0.2, L1 to L6, tented both sides, 1092 vias
v2: diameter 1, hole 0.5, L1 to L6, tented both sides, 109 vias

## Nets (pads, with @x,y where several pads share a name; then routed paths per layer and width w, separated by ;. In a path a pad name is that pad's centre, name@x,y a point inside that pad or via, vN(x,y) a via of type N, cw(c..) or ccw(c..) an arc to the next point about the centre after c; other vN are vias at no path point)
+1V5: C20.1 FB2.2 FB10.1 FB22.2 R18.2 TP1.1 U1.9 U1.10 | length 6.8
  L1 w0.8: v2(90,35.5) 94.3,35.5 95.4,34.4 FB10.1@96.35,34.4
  other v1: 50.3,36.7 50.3,37.7 51.3,37.7
+1V5_MPCIE1: C14.1 C15.1 C203.1 C204.1 FB22.1 J4.6 J4.28 J4.48
+1V5_MPCIE2: C29.1 C30.1 C31.1 C32.1 FB2.1 J9.6 J9.28 J9.48
+1V8_AUDIO2: C35.1 FB11.2 FB19.1 FB23.2 FB24.1 FB25.2 FB26.2 R26.2 R29.2 R30.2 R116.2 TP4.1 U3.9 U3.10 U6.2 | length 11.6
  L1 w0.25: C35.1@98.625,39.775 C35.1@98.8,39.6 ; v2@99.85,39.6 v2@100.1,39.85 ; v1(112.725,51.425) U6.2@113.9,51.425
  L1 w0.4: v1(107.2,47.9) FB23.2@107.95,47.9 ; v1(110.55,48) R29.2@111.2,48 ; R116.2@112.1,46.5 v1(112.1,47.15) ; R30.2@114.2,48 v1(114.2,48.6) ; FB25.2@116.35,35.7 v1(117.1,35.7)
  L1 w0.5: FB11.2@96.35,36.2 96.35,36.75 96.7,37.1 v1(98.9,37.1)
  L6 w0.4: FB26.2@98.9,34.05 v1(98.9,34.9)
  L6 w0.5: FB24.1@113.1,47.8 v1(113.1,48.6) ; v1(117.3,38.1) TP4.1@118.7,38.1
  L6 w0.6: v2@99.95,38.05 v2(100,38.05) ; v2@100,39.6 v2(100,39.65)
  other v1: 117.3,37
+1V8_OSC: C49.1 FB24.2 Y1.1 Y1.4 | length 5.5
  L6 w0.5: C49.1@113.1,45.3 C49.1@113.1,45.4 ; FB24.2@113.1,46.8 C49.1@113.1,45.4 ; Y1.1@117.05,45.37 Y1.4@114.75,45.37 113.13,45.37 C49.1@113.1,45.4
+3V3: C5.1 C6.1 C10.1 C11.1 C18.1 C19.1 C33.1 C34.1 C69.1 C70.1 C75.1 C115.1 C126.1 C156.1 C157.1 C158.1 C163.1 C166.1 C169.2 C170.2 C171.1 C172.1 C173.1 C174.1 C175.1 C176.1 C191.1 C192.1 C193.1 C213.1 C214.1 D1.2 D2.2 D3.2 D6.2 D7.2 D15.2 D18.2 D18.4 D21.2 FB1.1 FB3.1 FB7.1 FB12.1 FB13.2 J3.A9 J3.A10 J3.B8 J15.PC13 J15.PC14 J17.3 J24.10 J24.12 J29.4 J31.10 J33.1 J34.1 J36.2 J39.4 L9.2 R11.1 R15.2 R17.2 R44.2 R46.2 R73.2 R107.1 R108.2 R109.2 R111.2 R114.2 R117.2 R118.2 R119.2 R135.2 R140.2 R147.2 R150.2 R151.2 R152.2 R157.2 R160.2 R161.2 R165.2 R167.2 R172.2 R175.2 R177.2 R178.2 R179.2 R183.2 R187.2 TP3.1 U1.1 U1.2 U1.4 U3.1 U3.2 U3.4 U8.5 U16.26 U18.1 U18.2 U18.3 U18.8 U19.18 U19.21 U19.23 U19.24 U20.5 U21.5 U22.30 U23.5 U24.5 | length 94.1
  L1 w0.24: 62.1,23.95 U19.21@62.75,23.95 ; U19.24@62.75,22.45 62.15,22.45 v1(61.9,22.7) 62.15,22.95 U19.23@62.75,22.95
  L1 w0.25: U3.4@95.1,42.725 95.1,43.5
  L1 w0.28: 54.7,33.3 U1.4@54.7,34.025
  L1 w0.3: v1(60.8,23.1) v1@60.878,23.1
  L1 w0.35: U18.8@107.2,51.325 108.175,51.325 108.6,50.9 C170.2@108.6,49.6 ; U18.1@111,51.325 111.725,51.325 111.9,51.5 v1(111.9,51.975) ; U18.2@111,51.975 v1(111.9,51.975) ; U18.3@111,52.625 111.7,52.625 111.9,52.425 v1(111.9,51.975)
  L1 w0.4: v1(40.475,47.325) 40.675,47.525 J39.4@40.675,48.7 ; v1(45,2.7) R107.1@45.7,2.7 ; v1(49.2,1.9) D1.2@50.1,1.9 ; v1(51.2,1.9) D2.2@52.1,1.9 ; v1(53.2,1.9) D3.2@54.1,1.9 ; v1(54.2,29.9) 54.6,29.5 R152.2@55,29.5 ; v1(55.6,1.9) D6.2@56.5,1.9 ; R178.2@58.5,19.8 58.5,20.4 v1(59.1,21) ; R177.2@60.8,19.8 v1(60.8,20.6) ; v1@60.878,23.1 61.728,23.95 62.1,23.95 ; v1(62.7,25.5) 63.3,25.5 ; v1(63.1,19) R179.2@63.1,19.8 ; R161.2@63.8,38.7 64.4,38.7 v1(64.6,38.5) 64.8,38.7 R160.2@65.4,38.7 ; U20.5@68.35,48.75 68.4,48.8 C171.1@68.4,50.2 v1(68.4,51.1) ; R15.2@69.1,23.7 v1(70.3,23.7) R183.2@71.1,23.7 ; R46.2@71.8,86 v1(72.6,86) ; v1(72.3,19) R175.2@72.3,19.8 ; v1@85.2,47.9 C176.1@85.9,47.9 ; C176.1@85.95,47.95 U21.5@87.25,47.95 ; D7.2@87.6,96.219 v1@88.6,96.219 ; R117.2@90.6,49 v1(90.6,49.65) ; 95.1,43.5 95.1,43.8 95.2,43.9 C34.1@95.2,44.5 95.5,44.8 v1(95.5,45.2) ; v1(105.5,48.9) R114.2@105.5,49.6 ; v1(106.2,60.3) C213.1@105.5,60.3 105.5,59.5 U23.5@106.35,58.65 ; v1(107.4,58.1) R157.2@108.1,58.1 ; FB12.1@107.75,29.8 v1(107.75,32.5) ; v1(108.6,48.9) C170.2@108.6,49.6 ; R17.2@113.7,55 v1(113.7,55.7) ; R165.2@115.2,57.7 v1(115.2,58.4) ; v1(119.2,59.6) C75.1@119.2,58.9 119.2,58 U8.5@120.05,57.15
  L1 w0.43: 54.7,33.3 54.7,33 54.9,32.8 C19.1@54.9,32.4 v1(54.9,31.7)
  L4 (PWR) w0.5: 114.75,76.25 v1(115.85,76.25)
  L6 w0.23: v1(115.85,76.25) U22.30@115.85,77
  L6 w0.3: 31.3,89.4 31.55,89.65 U16.26@32.25,89.65
  L6 w0.4: v1(16.6,13.3) D21.2@16.6,15.081 ; v1(17,8.5) R167.2@17.8,8.5 ; v1(18.6,8.5) R140.2@19.4,8.5 ; R118.2@26.6,19.1 v1(27.3,19.1) ; v1(28,20) R187.2@28,20.7 ; v1(30.5,87.9) C163.1@30.5,88.5 30.5,88.6 31.3,89.4 ; R73.2@31.8,38.6 v1(31.8,39.3) ; U24.5@32.75,23.75 33.85,23.75 C214.1@34.3,23.3 v1(35,23.3) ; v1(33.1,84.8) R109.2@33.1,85.5 ; v1(34.7,84.8) R108.2@34.7,85.5 ; R147.2@38.4,8.5 v1(38.4,9.2) ; v1(40.475,47.325) 41.175,47.325 C157.1@41.2,47.3 ; R111.2@41.7,76.9 v1(41.7,77.7) ; v1(43,18.4) R119.2@43,19.1 ; D15.2@44.15,88.2 v1(44.15,89.05) ; R172.2@45.2,72.2 v1(46.1,72.2) ; v1(46.1,71.2) R151.2@47,71.2 ; J29.4@53.8,16.3 C158.1@53.8,18.6 v1(53.8,19.4) ; v1(66.1,38) 66.1,38.5 66.4,38.8 R150.2@66.8,38.8 ; R44.2@90,38.2 v1(90,38.9) ; v1(113,72.8) R135.2@113.7,72.8
  L6 w0.5: TP3.1@94.6,70.5 94.6,70.8 v2(95.3,71.5) ; v1(95.7,29.45) 97.55,29.45 97.75,29.25 FB13.2@98.9,29.25
  L6 w0.8: v1(95.7,28.2) 95.9,28 104.5,28 107.75,31.25 v1(107.75,32.5)
  other v1: 51,31.7 51.8,31.7 98.1,44.4 99.1,44.4 85,47.9 91.215,52.445 91.215,53.715 57.6,71 57.6,72.7 88.6,96.2
  other v2: 57.6,31.7 59.2,31.7 47.8,32.2 49.4,32.2 112.7,61.3 95.7,76.5 95.7,78.1 19.2,95.8 20.8,95.8 22.4,95.8
+3V3_AUX_PCIE: J3.B10 R11.2 | length 1.9
  L6 w0.5: R11.2@1,88.4 2.5,88.4 J3.B10@2.75,88.65
+3V3_HDMI: C72.1 R46.1 U7.2 | length 4.4
  L1 w0.25: 73.6,89.1 73.8,89.3 U7.2@73.8,90.15
  L1 w0.4: R46.1@71.8,87 72.6,87 73.1,87.5 C72.1@73.1,88.4 73.1,88.6 73.6,89.1
+3V3_MODULE: C4.1 C207.1 J2.50 R128.1 U15.3 | length 9.1
  L1 w0.25: J2.50@57.39,67.25 58.25,67.25 58.7,67.7 C4.1@59.2,67.7 59.4,67.7 60.1,68.4 C207.1@60.5,68.4 61.185,69.085 64.715,69.085 R128.1@65.4,68.4
+3V3_MPCIE1: C12.1 C13.1 C16.1 C17.1 C201.1 C202.1 C215.1 C216.1 FB1.2 J4.2 J4.24 J4.39 J4.41 J4.52 | length 11.3
  L6 w0.5: v1(22.2,32.8) J4.52@22.2,35.1 ; v1(26.6,24.6) J4.41@26.6,26.9 ; J4.39@27.4,26.9 v1(27.4,25.4) 27.4,24.8 v1(27.6,24.6) ; v1(33.4,32.9) J4.24@33.4,35.1 ; J4.2@45.4,35.1 v1(45.4,33.7) v1@46.1,33.7
  other v1: 26.6,25.4 22.2,33.6 33.4,33.7 46.2,33.7
+3V3_MPCIE2: C24.1 C25.1 C26.1 C27.1 C205.1 C206.1 C217.1 C218.1 FB3.2 J9.2 J9.24 J9.39 J9.41 J9.52 | length 11.8
  L6 w0.4: v1(56.4,33.7) v1(57.2,33.7) J9.52@57.2,35.1 ; J9.41@61.6,26.9 v1(61.6,28.4) 61.6,28.8 v1(62,29.2) 62.4,28.8 v1(62.4,28.4) J9.39@62.4,26.9 ; J9.24@68.4,35.1 v1(68.4,37.4)
  L6 w0.5: J9.2@80.4,35.1 80.4,36.4 v1(80.6,36.6) v1(81.4,36.6)
  other v1: 68.4,36.6
+3V3_TS: C150.1 C151.1 D21.1 D22.1 U2.1 | length 1.9
  L6 w0.35: 12.4,20.2 12.4,20.5 12.625,20.725 U2.1@13.5,20.725
  L6 w0.4: 12.4,19.8 12.4,20.2
+3V3_USB_HUB: C101.1 C102.2 C103.1 C104.2 C109.1 C110.1 C111.1 C112.1 C113.2 FB7.2 R70.2 R71.2 R72.2 R77.2 R169.2 U13.5 U13.10 U13.15 U13.23 U13.29 U13.36 | length 18.2
  L1 w0.25: v1(64.2,70.5) U13.10@64.2,71.3 ; v1@66.7,70.5 U13.15@66.7,71.3
  L1 w0.28: v1(62.6,74.1) U13.5@63.4,74.1 ; U13.29@67.7,76.9 67.7,77.422 67.765,77.487 v1@67.765,77.965 ; U13.23@69,74.1 v1(69.8,74.1)
  L1 w0.4: v1(63.4,76.9) U13.36@64.1,76.9 ; v1(70.1,78) R77.2@70.8,78 ; v1(71.4,71) 71.8,70.6 R72.2@71.8,70.2 ; R71.2@73.9,70.4 v1(73.9,71.1) R70.2@73.9,71.8
  L6 w0.4: C109.1@62.9,73.5 62.6,73.8 v1(62.6,74.1) 62.6,74.4 C113.2@62.9,74.7 ; v1(63.4,76.9) 63.5,77 C112.1@64.1,77 ; C110.1@63.8,71.2 63.8,70.9 v1(64.2,70.5) ; C111.1@66.7,77 67.4,77 67.825,77.425 67.825,77.975 v1(67.8,78) ; v1(66.75,70.5) 66.725,70.525 66.725,71.075 C101.1@66.6,71.2 C102.2@68,71.2 ; C104.2@69,73.5 69.2,73.5 v1(69.8,74.1) C103.1@69,74.9 ; v1(70.1,78) 70.5,77.6 R169.2@70.5,77.3
  other v1: 59.6,72.4 60.4,72.4
+5V: C71.1 C89.1 C90.1 C95.1 C177.1 C178.1 C188.1 C189.1 C190.1 C208.1 D20.2 FB4.1 FB6.1 J17.1 J18.3 J35.1 J35.4 L8.1 R51.2 R57.2 R75.1 R158.2 R159.2 TP2.1 U7.1 U11.7 U12.7 U22.10 | length 18.3
  L1 w0.28: 72.85,91.2 73.1,91.2 73.3,91 U7.1@73.3,90.15
  L1 w0.4: v1(71,91.2) C71.1@71.7,91.2 72.85,91.2 ; R158.2@109.7,58.1 v1(109.7,58.8) ; v1(120.6,59.7) R57.2@120.6,60.4 ; R51.2@121.8,55.1 v1(122.5,55.1)
  L1 w0.5: 18.5,66.4 18.765,66.665 U12.7@21.2,66.665 ; U11.7@74.765,79.1 v2@74.765,81.9 ; J35.1@123.1,83.5 J35.1@123.2,83.4
  L1 w0.8: v2(18.2,64) 18.2,66.1 18.5,66.4
  L6 w0.23: U22.10@115.35,81.8 115.35,82.45
  L6 w0.4: C95.1@73,75.8 73.3,75.8 73.5,76 v1(73.5,76.5) 73.5,77 73.2,77.3 R75.1@73,77.3 ; v1(107.7,93) TP2.1@108.4,93 ; 115.35,82.45 v1(115.35,83.55)
  other v2: 121,48.1 122.6,48.1 98.2,57.1 122.6,61.6 124.2,61.6 11.8,77.6 11,78.9 95.7,81.1 74.8,81.9 95.7,83.1 95.7,85.1
+5V_ATX: D20.1 J38.4 | length 0.6
  L1 w1: J38.4@130,80.26 J38.4@130.43,79.83
+5V_AUDIO1: C37.1 C38.1 C39.1 C40.1 C41.1 C42.1 C43.1 FB4.2 R31.2 R33.2 U4.8 U4.9 U4.17 U4.18 U4.30 | length 14.2
  L1 w0.28: 119.3,27.35 U4.30@120.625,27.35 ; U4.18@124.35,30.575 124.35,31.5 ; U4.8@124.85,25.625 124.85,25.05 125,24.9 ; U4.17@124.85,30.575 124.85,31.15 125.1,31.4 ; U4.9@125.575,26.35 126.15,26.35 126.4,26.1
  L1 w0.4: v1(117.4,33.3) R31.2@117.4,33.9 ; v1(118.6,22.2) R33.2@118.6,22.9 ; 124.35,31.5 124.35,31.65 124.5,31.8 C39.1@124.5,32.4 124.8,32.4 v1(125.2,32.8) ; 125,24.9 125.9,24 C38.1@125.9,23.9 v1(126.6,23.9) ; 125.1,31.4 125.9,32.2 C41.1@125.9,32.4 126.2,32.4 v1(126.6,32.8) ; 126.4,26.1 127.1,25.4 C42.1@127.3,25.4 v1(128,25.4)
  other v1: 118.2,26.4 119,26.4
  other v2: 122.2,38.7 123.8,38.7
+5V_HDMI_CON: C74.1 J16.18 R48.2 R49.2 U7.38 | length 25.4
  L1 w0.28: U7.38@73.2,96.3 U7.38@73.3,96.3
  L1 w0.3: v1(83.3,97.5) J16.18@83.3,99.14
  L1 w0.4: v1(70.9,96.3) C74.1@71.6,96.3 U7.38@73.2,96.3 ; R49.2@85.3,91.9 v1(85.3,92.65) R48.2@85.3,93.4
  L6 w0.8: v1(70.9,96.3) 72.7,96.3 75.4,99 81.896,99 84.85,96.046 84.85,93.1 v1(85.3,92.65)
+5V_LDO1: C179.1 C180.1 R123.2 U22.7 | length 0.8
  L6 w0.23: 113.45,80.65 U22.7@114.2,80.65
+5V_PVCC1: C181.1 R123.1 R124.2 R125.1 U22.19 | length 17.8
  L4 (PWR) w0.6: 118.1,79.925 118.825,79.925 119,80.1 v1(120.2,80.1)
  L4 (PWR) w0.8: v1(109.8,79.3) 109.804,79.3 110.479,78.625 113.825,78.625 115.125,79.925 118.1,79.925
  L6 w0.23: U22.19@119,80.15 120.15,80.15 v1(120.2,80.1)
  L6 w0.4: 119.8,80.1 C181.1@120.9,80.1
  L6 w0.5: 108.05,82.3 108.05,80.25 108.5,79.8 R125.1@109,79.8 109.311,79.8 109.311,79.789 v1(109.8,79.3)
+5V_USB1_VBUS: C85.1 C86.1 D8.1 J20.1 U12.5 | length 1.4
  L1 w0.58: U12.5@21.2,69.205 v2(22.6,69.205)
  other v2: 19.2,88.7 17.8,93.3 17.8,94.9
+5V_USB_OTG: C87.1 C88.1 D9.1 FB6.2 J21.1 | length 1.2
  L1 w0.4: J21.1@4.875,70.8 6.1,70.8
  other v2: 6.4,73.1 6.4,74.7
+5V_USB_VBUS: C3.1 J1.18 R159.1 | length 3.4
  L1 w0.3: J1.18@87.79,59.25 C3.1@89.7,59.25
  L1 w0.4: R159.1@89.7,57.8 C3.1@89.7,59.25
+5V_USBDN1_VBUS: C91.1 C93.1 D10.1 J22.1 U11.8 | length 3.5
  L1 w0.58: v2(72.7,82.3) 73.495,81.505 U11.8@73.495,79.1
  other v2: 67.1,93.6 68.7,93.6
+5V_USBDN2_VBUS: C92.1 C94.1 D11.1 J22.5 U11.5 | length 10.7
  L1 w0.6: U11.5@77.305,79.1 77.305,80.5
  L1 w0.8: v2(74.1,84.1) 75,83.2 75.7,83.2 77.3,81.6 77.3,80.505 77.305,80.5
  L6 w0.8: D11.1@58,92.2 59,92.2 60,93.2 J22.5@60,94.71
  other v2: 66.7,89.6 68.3,89.6
+5V_USBDN3_VBUS: C96.1 C97.1 D13.1 J23.1 U12.8 | length 1.4
  L1 w0.58: U12.8@21.2,65.395 v2(22.6,65.395)
  other v2: 18.3,70.5 19.9,70.5
+5V_VCC1: C182.1 R125.2 R129.2 R133.2 R134.2 R136.2 R154.2 U22.3 U22.20 | length 15.3
  L4 (PWR) w0.6: v1(112,77) 113.9,77 115.7,78.8 119,78.8 119.5,79.3 v1(119.9,79.3)
  L6 w0.23: 113.347,78.425 113.572,78.65 U22.3@114.2,78.65 ; U22.20@119,79.65 119.55,79.65 v1(119.9,79.3)
  L6 w0.4: C182.1@112.6,78 112.922,78 113.347,78.425
  L6 w0.5: 109.925,76.575 111.575,76.575 v1(112,77) 112.6,77.6 C182.1@112.6,78
+12V_ATX: C7.1 C8.1 C9.1 D17.2 J3.A2 J3.A3 J3.B1 J3.B2 J3.B3 J18.1 J38.1 | length 0.1
  L6 w0.5: J3.B2@2.7,96.7 J3.B2@2.75,96.65 ; J3.A2@9.2,96.7 J3.A2@9.25,96.65
  other v2: 126.2,90.3 126.2,91.9 126.2,93.5
+AUD2_AVDD: C45.1 FB23.1 U5.5 | length 5.8
  L1 w0.3: U5.5@109.95,42.95 109.95,44 110.45,44.5 110.5,44.55 C45.1@110.5,44.9
  L1 w0.4: FB23.1@109.45,47.9 109.9,47.45 109.9,45.5 C45.1@110.5,44.9 ; C45.1@110.4,45 C45.1@110.6,45
+AUD2_DVDD: C44.1 C50.1 FB19.2 U5.26 U5.32 | length 9.1
  L1 w0.25: U5.32@112.55,42.25 U5.32@112.65,42.25 113.85,42.25 ; U5.26@112.65,39.25 113.6,39.25
  L1 w0.3: 113.6,39.25 113.75,39.25
  L1 w0.4: 113.8,42.2 C44.1@114.7,42.2 v1(114.7,41.5)
  L3 w0.8: v1@114.7,41.525 115.275,41.525 116.175,40.625 116.175,39.075 115.4,38.3 v1(114.8,38.3)
+AUD2_PVDD: C51.1 FB25.1 U5.23 | length 5
  L1 w0.3: U5.23@111.45,38.05 111.45,37.45 111.7,37.2 112,37.2
  L1 w0.4: 112,37.2 112.4,37.2 113.4,36.2 C51.1@113.4,35.8 114.75,35.8 FB25.1@114.85,35.7
+BAT: J32.2 J32.3 R110.1
+BKLT_VCC: C82.1 C83.1 J18.2 J19.1
+MPCIE1_SIM_PWR: C22.1 D4.3 J4.8 J5.C1 | length 9.7
  L6 w0.4: v1(43,32.9) J4.8@43,35.1
  L6 w0.5: J5.C1@28,57.09 30.01,57.09 C22.1@30.6,56.5 30.984,56.5 34,53.484
  other v1: 43,33.7
  other v2: 34.5,52.9
+MPCIE1_SIM_VPP: C23.1 J4.16 J5.C6 | length 4.1
  L6 w0.4: v1(39.8,33.6) J4.16@39.8,35.1
  L6 w0.5: J5.C6@28,53.28 v1(29.6,53.28) 30.58,53.28 C23.1@30.6,53.3
+MPCIE2_SIM_PWR: C28.1 D5.3 J7.C1 J9.8 | length 10.1
  L1 w0.5: J7.C1@28,51.11 29.6,51.11 29.79,51.3 C28.1@30.6,51.3 ; 30.9,51.3 31.375,51.775 31.375,53.659 33.2,55.484
  L6 w0.5: J9.8@78,35.1 v1(78,36.6) v1(78,37.4)
  other v2: 33.9,56.45
+MPCIE2_SIM_VPP: C106.1 J7.C6 J9.16 | length 4.1
  L1 w0.4: J7.C6@28,54.92 v1(29.6,54.92) 30.58,54.92 C106.1@30.6,54.9
  L6 w0.4: J9.16@74.8,35.1 v1(74.8,36.6)
+RTC: C167.1 C168.1 D15.3 R171.2 U17.8 | length 18.5
  L6 w0.5: R171.2@36.3,73.5 36.3,74.2 37.495,75.395 U17.8@38.9,75.395 38.905,75.4 C167.1@40.7,75.4 C168.1@42.1,75.4 42.6,75.4 42.9,75.7 42.9,76.5
  L6 w0.8: 43.2,85.1 D15.3@43.2,86.2
  L6 w1: 42.9,76.5 42.9,80.6 43.2,80.9 43.2,85.1
+V_INPUT: D16.2 J37.1
+VBAT: D15.1 D22.2 R110.2 R185.2 | length 2.9
  L6 w0.4: v1(17.7,19.1) R185.2@18.4,19.1
  L6 w0.5: D22.2@18.3,15.081 18.781,15.081 19.5,15.8 v1(19.5,16.5)
  other v1: 41.6,89 42.4,89
+VDD_LVDS: C76.1 C77.1 C78.1 C79.1 J41.1 J41.2 R52.2 R53.2 U9.6 U9.7 U9.8 | length 23.3
  L6 w1: 1.9,13.9 1.9,30.4 5.3,33.8 7.3,33.8
  other v2: 12.15,13.5 12.15,15.25
+VDD_LVDS_SW: C80.1 J17.2 U9.2 U9.3
  other v2: 4,20.6 4,22.2
+VDDA: C129.1 FB13.1 FB26.1 U14.5 | length 2.4
  L1 w0.3: 98.5,31.35 U14.5@98.85,31.35
  L1 w0.4: v1(97.2,31.6) 97.5,31.3 C129.1@97.5,30.9 97.8,30.9 98.25,31.35 98.5,31.35
+VDDD: C128.1 FB10.2 FB11.1 U14.30 | length 6.6
  L1 w0.3: 100.725,34.975 100.95,34.75 U14.30@100.95,34.05
  L1 w0.4: FB10.2@97.85,34.5 FB11.1@97.85,36.2 99.225,36.2 99.425,36 C128.1@100.5,36 100.5,35.2 100.725,34.975
+VDDIO: C127.1 FB12.2 U14.20 | length 3.6
  L1 w0.3: U14.20@104.15,31.35 105,31.35
  L1 w0.4: 105,31.35 106.05,31.35 C127.1@106.1,31.4 106.1,29.95 FB12.2@106.25,29.8
+VIN: C1.1 C2.1 C183.1 C184.1 C185.1 C196.1 C197.1 D16.1 D17.1 J1.1 J1.2 J1.3 J1.4 J1.5 Q2.8 Q3.8 R56.2 R124.1 U22.6 | length 2.8
  L1 w0.5: R56.2@107.6,63.8 107.6,64.6 v1(108.2,65.2)
  L6 w0.23: 113.05,80.15 U22.6@114.2,80.15
  other v1: 112,80.6 112,81.4
  other v2: 86.2,52 86.2,53.6 78.6,54.5 80.2,54.5 78.6,56.7 115,87 97.8,87.5 99.4,87.5 101.1,87.5 115.5,89.1 113.9,89.9 112.2,91.4 112.2,93
+VIN_LVDS_AMP: R56.1 U10.8 | length 4.3
  L1 w0.4: R56.1@107.6,62.8 107.6,61.4 108.805,60.195 U10.8@110,60.195
+VREF1_2V_3V3: C195.1 U22.1 | length 2.2
  L6 w0.23: 113.8,77.3 113.85,77.35 113.85,77.55 113.95,77.65 U22.1@114.2,77.65
  L6 w0.4: C195.1@112.8,76.1 113.8,77.1 113.8,77.2
+VREF1_3V3_3V3: C194.1 U22.5 | length 1.7
  L6 w0.23: C194.1@112.6,79.3 113.013,79.3 113.363,79.65 U22.5@114.2,79.65
AMP_BYPASS: C67.2 U4.24 | length 2
  L1 w0.28: C67.2@120.9,32.4 121.35,31.95 U4.24@121.35,30.575
AMP_C1N: C66.1 U4.12 | length 1.7
  L1 w0.28: U4.12@125.575,27.85 127.25,27.85 C66.1@127.3,27.8
AMP_C1P: C66.2 U4.10 | length 1.7
  L1 w0.28: U4.10@125.575,26.85 127.25,26.85 C66.2@127.3,26.8
AMP_GAIN: R33.1 R35.2 U4.31 U4.32 | length 7.3
  L1 w0.25: R35.2@117,23.9 R33.1@118.6,23.9 119,23.9 119.6,24.5 119.6,26.1 ; U4.32@120.625,26.35 119.85,26.35 119.6,26.1 ; U4.31@120.625,26.85 119.75,26.85 119.6,26.7 119.6,26.1
AMP_HP_EN: R31.1 U4.22 | length 6.7
  L1 w0.25: R31.1@118.4,33.9 121.4,33.9 122.35,32.95 U4.22@122.35,30.575
AMP_PVSS: C58.1 U4.13 U4.14 | length 1.5
  L1 w0.28: U4.13@125.575,28.35 126.3,28.35 ; U4.14@125.575,28.85 126.3,28.85
AMP_REG_EN: R32.2 U4.25 | length 2.6
  L1 w0.25: R32.2@118.4,30.7 119.1,30.7 119.95,29.85 U4.25@120.625,29.85
AMP_REG_OUT: C68.2 U4.29 | length 2.3
  L1 w0.28: C68.2@118.6,28.4 119.193,28.4 119.743,27.85 U4.29@120.625,27.85
AMP_SPKR_ENN: R34.2 U4.23 | length 6.1
  L1 w0.25: R34.2@118.4,32.3 119.3,33.2 121.3,33.2 121.85,32.65 U4.23@121.85,30.575
AUD2_AUX: TP5.1 U5.17 | length 1.5
  L1 w0.25: v1(108.45,37.25) U5.17@108.45,38.05
  L6 w0.25: TP5.1@108.45,36.65 v1@108.45,37.3
AUD2_FIL_MIC_IN: C54.1 FB5.2 J11.1 | length 5.8
  L1 w0.3: FB5.2@126.6,36.6 C54.1@126.6,38 J11.1@131,38
AUD2_I2C2_SCL: R30.1 U5.2 U6.3 | length 11.2
  L1 w0.25: U5.2@111.45,42.95 111.45,43.484 111.9,43.934 113.134,43.934 114,44.8 114,46.2 115.2,47.4 R30.1@115.2,48 115.2,50.5 114.925,50.775 U6.3@113.9,50.775
AUD2_I2C2_SDA: R29.1 U5.3 U6.4 | length 10.3
  L1 w0.25: U5.3@110.95,42.95 110.95,43.65 111.9,44.6 112.6,44.6 113.3,45.3 113.3,46.9 R29.1@112.2,48 112.2,49.5 112.825,50.125 U6.4@113.9,50.125
AUD2_IRQ: R116.1 U5.4 | length 3.2
  L1 w0.25: U5.4@110.45,42.95 110.45,43.85 R116.1@112.1,45.5
AUD2_MIC_BIAS: C46.1 R28.2 U5.10 | length 6.5
  L1 w0.3: 106.6,42.5 106.875,42.225 106.875,42.025 107.15,41.75 U5.10@107.75,41.75
  L1 w0.5: R28.2@103.1,42.1 103.1,42.5 103.6,43 105.2,43 105.6,43.4 ; C46.1@105.6,43.7 105.6,43.5 106.6,42.5
AUD2_MIC_C_L: C65.2 U5.11 | length 2.5
  L1 w0.3: C65.2@105.636,42.3 106.686,41.25 U5.11@107.75,41.25
AUD2_MIC_C_R: C64.2 U5.14 | length 3.1
  L1 w0.3: C64.2@105.6,38.1 105.6,38.5 106.85,39.75 U5.14@107.75,39.75
AUD2_MIC_IN: C48.2 C53.2 FB5.1 R28.1 | length 26.4
  L1 w0.3: R28.1@103.1,41.1 103.7,41.1 103.9,40.9 C48.2@104.6,40.9 C53.2@104.6,39.5 v1(104.6,38.8) ; v1(125,36.6) FB5.1@125.6,36.6
  L3 w0.3: v1(104.6,38.8) 106.3,38.8 107.3,39.8 111.8,39.8 114.075,37.525 124.075,37.525 v1(125,36.6)
AUD2_MIC_IN_L: C48.1 U5.12 | length 2.2
  L1 w0.3: C48.1@105.6,40.9 106.4,40.9 106.55,40.75 U5.12@107.75,40.75
AUD2_MIC_IN_R: C53.1 U5.13 | length 2.5
  L1 w0.3: C53.1@105.6,39.5 106.35,40.25 U5.13@107.75,40.25
AUD2_PREG: C61.1 U5.7 | length 2.9
  L1 w0.3: C61.1@107.8,45 107.8,44.6 108.1,44.3 108.7,44.3 108.95,44.05 U5.7@108.95,42.95
AUD2_REF: C62.1 U5.6 | length 2.2
  L1 w0.3: C62.1@109.2,45 109.45,44.75 U5.6@109.45,42.95
AUD2_REG: C63.1 U5.8 | length 3.7
  L1 w0.3: C63.1@106.4,45 106.4,44.3 106.9,43.8 108.2,43.8 108.45,43.55 U5.8@108.45,42.95
AUD3_CLK: J2.20 U14.21 | length 75.4
  L1 w0.25: J2.20@57.39,59.75 59.05,59.75 60.4,61.1 61.6,61.1 62.1,61.6 70.6,61.6 72.3,59.9 72.3,59.4 73.4,58.3 73.4,49.4 80,42.8 87.8,42.8 88.9,43.9 v1(88.9,44.6) ; U14.21@104.15,31.85 104.75,31.85 v1(104.95,32.05)
  L3 w0.2: v1(88.9,44.6) 89.7,45.4 92.5,45.4 93.5,46.4 v1(95.6,46.4)
  L6 w0.25: v1(95.6,46.4) 96,46 96,42.8 95.8,42.6 95.8,37.9 98.3,35.4 99.107,35.4 102.457,32.05 v1(104.95,32.05)
AUD3_RXD: J2.22 U14.25 | length 75.3
  L1 w0.25: J2.22@57.39,60.25 58.65,60.25 60.1,61.7 61.1,61.7 62.4,63 70.5,63 74.3,59.2 74.3,50.2 80.7,43.8 v1(87.9,43.8) ; U14.25@103.45,34.05 103.45,34.65 v1(103.65,34.85)
  L3 w0.2: v1(87.9,43.8) 88.6,43.1 92.4,43.1 93,43.7 95.7,43.7 97.6,45.6 v1(97.6,46.6)
  L6 w0.25: v1(97.6,46.6) 98.2,47.2 100.2,47.2 100.6,46.8 100.6,45.8 102.2,44.2 102.2,41.9 103.3,40.8 103.3,38 104.55,36.75 104.55,35.45 103.95,34.85 v1(103.65,34.85)
AUD3_TXC: J2.16 U14.24 | length 75.3
  L1 w0.25: J2.16@57.39,58.75 59.85,58.75 60.9,59.8 69.2,59.8 71.9,57.1 71.9,48.4 79.2,41.1 87.5,41.1 88,41.6 v1(88.5,41.6) ; U14.24@104.15,33.35 104.65,33.35 v1(104.95,33.65)
  L3 w0.2: v1(88.5,41.6) 93.35,41.6 94.05,42.3 96.6,42.3 98.2,43.9 101.2,43.9 102.1,44.8 v1(102.1,45.5)
  L6 w0.25: v1(102.1,45.5) 103,44.6 103,42.593 106,39.593 106,34.2 105.45,33.65 v1(104.95,33.65)
AUD3_TXD: J2.18 U14.26 | length 75.4
  L1 w0.25: J2.18@57.39,59.25 59.45,59.25 60.7,60.5 70.007,60.5 70.9,59.607 70.9,59.193 72.5,57.593 72.5,48.8 79.5,41.8 87.4,41.8 v1(87.9,42.3) ; U14.26@102.95,34.05 102.95,35 102.95,35.1 v1(103.65,35.8)
  L3 w0.2: v1(87.9,42.3) 92.9,42.3 93.5,42.9 95.893,42.9 98.393,45.4 99.6,45.4 99.9,45.7 99.9,46.3 99.6,46.6 v1(98.8,46.6)
  L6 w0.25: v1(98.8,46.6) 98.8,45.5 99.3,45 99.9,45 101.4,43.5 101.4,41.1 102.4,40.1 102.4,39.5 101.8,38.9 101.8,38.3 103.65,36.45 v1(103.65,35.8) v1@103.65,35.7
AUD3_TXFS: J2.24 U14.23 | length 75.4
  L1 w0.25: J2.24@57.39,60.75 58.25,60.75 59.8,62.3 60.6,62.3 62.1,63.8 67.8,63.8 68.2,64.2 70.3,64.2 74.9,59.6 74.9,50.6 80.9,44.6 v1(87.9,44.6) ; U14.23@104.15,32.85 v1(104.95,32.85)
  L3 w0.2: v1(87.9,44.6) 88.4,44.1 92.275,44.1 92.675,44.5 95.534,44.5 96.6,45.566 v1(96.6,46.6)
  L6 w0.25: v1(96.6,46.6) 96.9,46.3 96.9,44.8 97.8,43.9 99.9,43.9 100.4,43.4 100.4,40.6 101,40 101,37.807 103,35.807 103,34.4 104.55,32.85 v1(104.95,32.85)
AUD_HP_L: C136.1 C137.1 U14.6 | length 8.6
  L1 w0.3: C137.1@92.9,32.675 93.825,32.675 94.2,32.3 94.2,30.9 94.5,30.6 C136.1@94.9,30.6 95.3,30.6 95.9,30 97.8,30 98.65,30.85 U14.6@99.25,30.85
AUD_HP_R: C138.1 C139.1 U14.2 | length 10.6
  L1 w0.3: C139.1@90.1,32.675 90.1,33.7 90.7,34.3 93.8,34.3 C138.1@94.9,33.2 97.8,33.2 98.15,32.85 U14.2@98.85,32.85
AUD_OUT_L: C142.1 U14.12 | length 2.3
  L1 w0.3: C142.1@100.9,27.1 100.9,27.25 101.45,27.8 U14.12@101.45,29.15